# Altium PCB Knob-v1.0.PcbDoc (part 3 of 3)
Units mil, origin at the board's own origin, x right, y up, seen from the top; angles counter-clockwise.
Board outline 3346.46 x 5475.65 mil, 2 copper layers (Top Layer, Bottom Layer), stack 61.811 mil thick; 109 components, 69 nets, 369 pads, 208 vias.
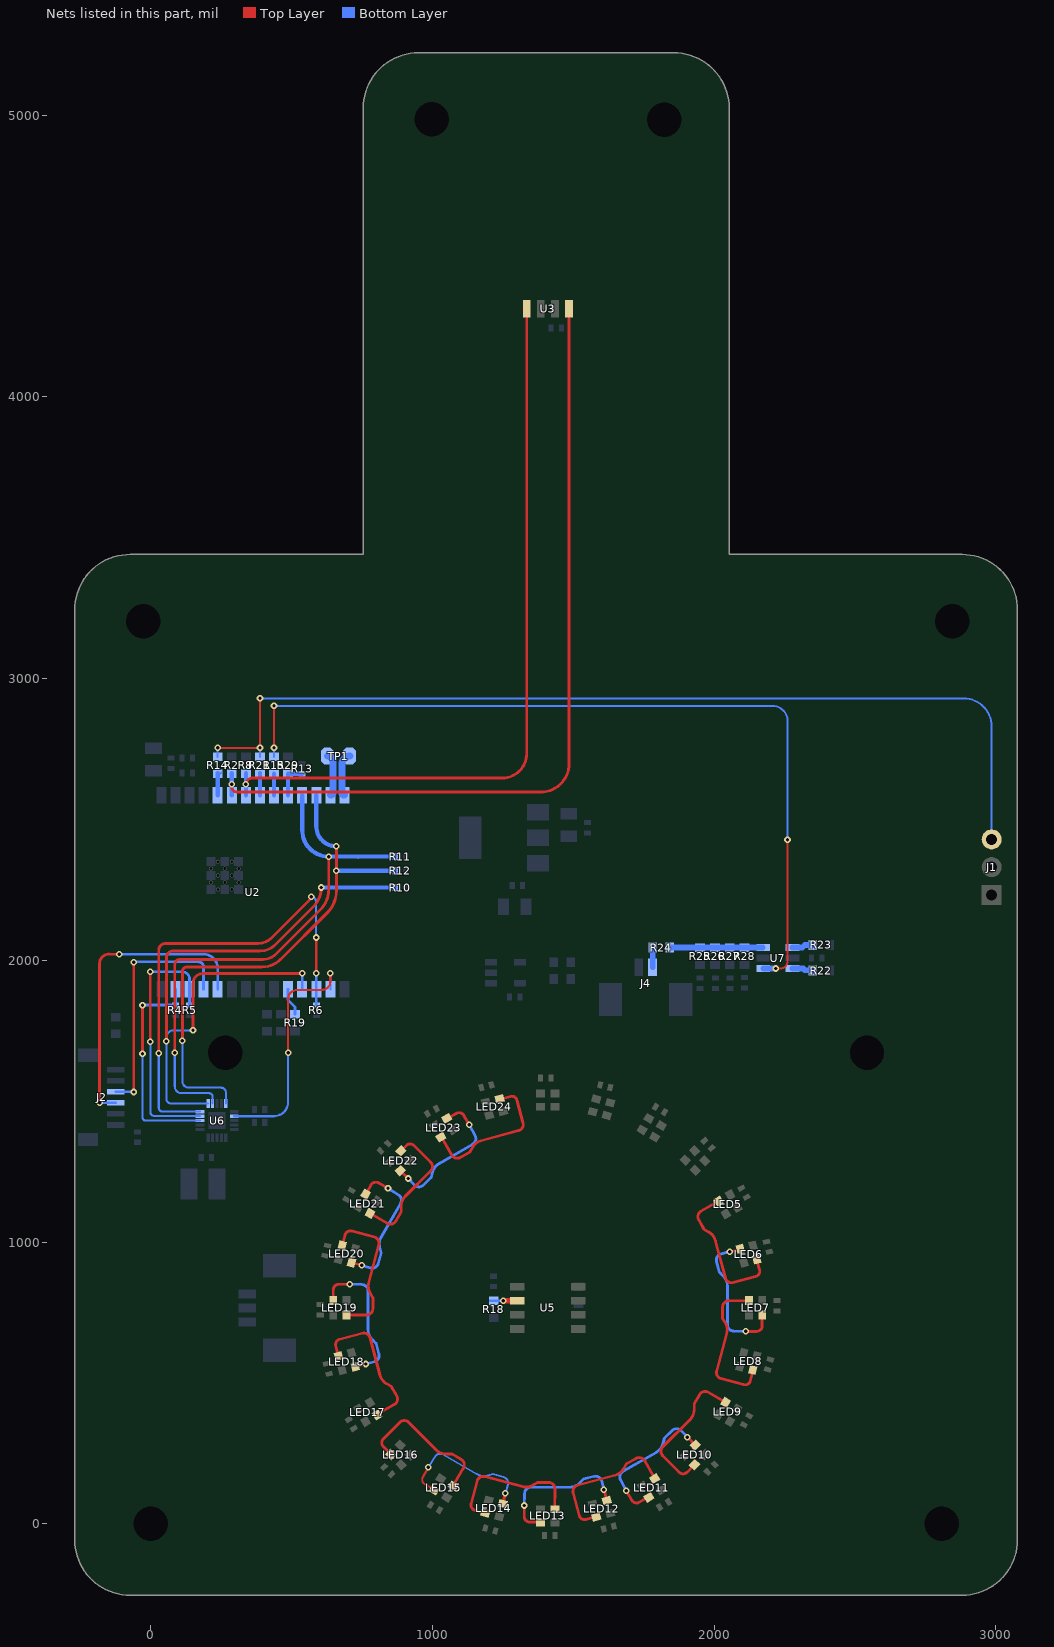
[diagram p2: the nets of this part, all layers, seen from the top]

## Via types
v1: diameter 23.62, hole 11.81, Top Layer to Bottom Layer, tented both sides, 208 vias

## Nets (pads, with @x,y where several pads share a name; then routed paths per layer and width w, separated by ;. In a path a pad name is that pad's centre, name@x,y a point inside that pad or via, vN(x,y) a via of type N, cw(c..) or ccw(c..) an arc to the next point about the centre after c; other vN are vias at no path point) (continued)
NetLED5_2: LED5.2 LED6.4 | length 527.3
  Top Layer w10: 1953.54,1109.03 LED5.2@2015.18,1143.91 ; 1953.54,1109.04 ccw(c1964.93,1089.8) 1945.56,1078.65 1964.48,1045.17 1981.35,1035.43 cw(c1957.71,992.71) 2004.87,1005.35 2040.59,872.04 ccw(c2062.15,877.78) 2067.68,856.17 2147.64,877.6 2147.7,877.62 ccw(c2142.6,897.08) 2160.04,887.05 ccw(c2144.06,896.23) 2161.86,901 LED6.4@2151.92,938.09
NetLED6_2: LED6.2 LED7.4 | length 526.1
  Top Layer w10: v1(2056.11,965.63) LED6.2@2093.2,975.56 ; v1(2112.73,682.73) 2151.12,682.73 ccw(c2151.23,702.85) 2165.48,688.64 ccw(c2152.42,701.65) 2170.85,701.65 LED7.4@2170.85,740.05
  Bottom Layer w10: 2024.64,957.83 v1@2056.03,965.95 ; 2024.64,957.84 ccw(c2030.66,936.31) 2009.06,930.55 2018.67,893.31 2032.45,879.54 cw(c1998.56,844.39) 2047.38,844.39 2047.38,706.38 ccw(c2069.69,706.35) 2069.44,684.04 v1(2112.73,682.73)
NetLED7_2: LED7.2 LED8.4 | length 528
  Top Layer w10: LED7.2@2123.57,791.5 2113.55,791.59 2053.39,792.11 ccw(c2053.36,785.11) 2053.31,792.11 2053.25,792.11 ccw(c2053.6,768.91) 2030.4,768.94 2030.05,730.48 2039.79,713.61 cw(c1997.96,688.44) 2045.11,675.8 2009.39,542.5 ccw(c2030.94,536.69) 2024.92,515.21 2104.89,493.78 2104.94,493.77 ccw(c2110.25,513.18) 2120.34,495.77 ccw(c2111.1,511.71) 2128.9,506.94 LED8.4@2138.84,544.03
NetLED9_2: LED9.2 LED10.4 | length 527.3
  Top Layer w10: LED10.4@1930.74,209.52 1903.59,182.37 cw(c1890.56,195.4) 1890.59,176.97 cw(c1890.56,197.09) 1876.26,182.94 1876.22,182.98 1817.68,241.52 cw(c1833.63,257.12) 1817.87,272.91 1915.46,370.5 ccw(c1880.94,405.02) 1929.75,405.91 1929.75,425.39 1949.29,458.52 cw(c1968.63,447.32) 1979.59,466.8 LED9.2@2040.61,430.85
NetLED10_2: LED10.2 LED11.4 | length 526.1
  Top Layer w10: v1(1688.91,116.94) 1708.1,83.69 ccw(c1725.58,93.65) 1720.41,74.21 ccw(c1725.14,92.02) 1734.36,76.06 LED11.4@1767.61,95.26 ; v1(1905.6,307.41) LED10.2@1932.75,280.26
  Bottom Layer w10: 1668.41,155.08 cw(c1687.85,166.02) 1676.72,185.36 1796.24,254.36 ccw(c1771.83,296.64) 1819.21,284.86 1824.25,303.68 1851.7,330.62 cw(c1867.49,314.8) 1883.11,330.78 v1@1905.84,307.65 ; 1668.41,155.08 v1(1688.91,116.94)
NetLED11_2: LED11.2 LED12.4 | length 528
  Top Layer w10: LED12.4@1581.85,24.98 1544.76,15.04 cw(c1539.99,32.84) 1530.8,16.86 cw(c1540.83,34.3) 1521.37,29.2 1521.36,29.25 1499.93,109.22 cw(c1521.54,114.75) 1515.8,136.31 1649.1,172.03 ccw(c1636.47,219.19) 1679.18,195.55 1688.92,212.42 1722.41,231.34 cw(c1733.98,211.23) 1753.9,223.14 1753.93,223.08 cw(c1747.89,219.55) 1753.97,223.02 1783.6,170.65 LED11.2@1788.53,161.94
NetLED12_2: LED12.2 LED13.4 | length 526.1
  Top Layer w10: v1(1326.22,64.33) 1326.22,25.94 ccw(c1346.34,25.83) 1332.14,11.58 ccw(c1345.14,24.64) 1345.14,6.21 LED13.4@1383.54,6.21 ; v1(1609.12,120.95) LED12.2@1619.06,83.86
  Bottom Layer w10: v1(1326.22,64.33) 1327.54,107.62 cw(c1349.84,107.37) 1349.88,129.68 1487.88,129.68 ccw(c1487.88,178.5) 1523.03,144.61 1536.8,158.39 1574.05,168 cw(c1579.8,146.4) 1601.33,152.42 v1@1609.44,121.03
NetLED13_2: LED13.2 LED14.4 | length 527.3
  Top Layer w10: LED14.4@1188.1,37.94 1151.02,47.88 cw(c1155.78,65.68) 1139.84,56.43 cw(c1157.25,66.52) 1137.84,71.83 1137.86,71.89 1159.29,151.85 cw(c1180.77,145.84) 1186.57,167.38 1319.88,131.66 ccw(c1332.51,178.82) 1357.69,136.99 1374.56,146.73 1413.02,146.37 cw(c1412.99,124.02) 1435.34,124.27 LED13.2@1434.72,53.45
NetLED14_2: LED14.2 LED15.4 | length 526.1
  Top Layer w7: v1(986.11,200.14) 966.91,166.89 ccw(c984.28,156.74) 964.86,151.5 ccw(c982.64,156.3) 973.43,140.34 LED15.4@1006.69,121.15
  Top Layer w10: LED14.2@1249.47,70.63 v1(1259.41,107.72)
  Bottom Layer w7: v1(986.11,200.14) 1008.89,236.97 cw(c1028.09,225.6) 1039.27,244.9 1158.79,175.9 ccw(c1183.2,218.18) 1196.69,171.26 1215.51,176.3 1252.56,166 cw(c1246.75,144.42) 1268.4,138.88 v1@1259.73,107.63
NetLED15_2: LED15.2 LED16.4 | length 528
  Top Layer w10: LED16.4@852.94,246.88 825.79,274.03 cw(c838.81,287.06) 820.39,287.03 cw(c840.51,287.06) 826.36,301.36 826.4,301.4 884.94,359.94 cw(c900.53,343.99) 916.33,359.75 1013.92,262.16 ccw(c1048.44,296.68) 1049.32,247.87 1068.81,247.87 1101.94,228.33 cw(c1090.31,208.25) 1110.58,196.96 1110.55,196.9 cw(c1104.46,200.37) 1110.51,196.84 1079.97,145 LED15.2@1074.89,136.37
NetLED17_2: LED17.2 LED18.4 | length 527.3
  Top Layer w10: LED18.4@667.29,594.35 657.36,631.44 cw(c675.15,636.21) 659.18,645.39 cw(c676.62,635.36) 671.51,654.82 671.57,654.84 751.53,676.27 cw(c757.07,654.66) 778.63,660.4 814.34,527.09 ccw(c861.5,539.73) 837.86,497.01 854.74,487.27 873.66,453.79 cw(c854.28,442.64) 865.68,423.4 LED17.2@804.04,388.53
NetLED18_2: LED18.2 LED19.4 | length 526.1
  Top Layer w10: LED19.4@648.53,792.66 648.53,831.05 cw(c666.95,831.06) 653.9,844.06 cw(c668.15,829.86) 668.25,849.98 v1(706.65,849.98) ; LED18.2@726.17,557.14 v1(763.26,567.08)
  Bottom Layer w10: v1(706.65,849.98) 749.93,848.66 cw(c749.68,826.35) 771.99,826.32 771.99,688.31 ccw(c820.82,688.31) 786.92,653.17 800.7,639.39 810.31,602.15 cw(c788.71,596.39) 794.74,574.87 v1@763.35,566.76
NetLED19_2: LED19.2 LED20.4 | length 528
  Top Layer w10: LED20.4@680.54,988.68 690.48,1025.76 cw(c708.28,1021) 699.03,1036.94 cw(c709.12,1019.53) 714.43,1038.94 714.49,1038.92 794.45,1017.49 cw(c788.44,996.02) 809.98,990.21 774.26,856.9 ccw(c821.42,844.27) 779.59,819.1 789.33,802.22 788.97,763.76 cw(c765.77,763.79) 766.12,740.59 766.06,740.59 cw(c766.02,747.59) 765.99,740.59 705.82,741.12 LED19.2@695.81,741.2
NetLED20_2: LED20.2 LED21.4 | length 526.1
  Top Layer w10: LED20.2@712.93,927.01 v1(750.02,917.07) ; LED21.4@763.44,1169.8 782.64,1203.05 cw(c798.6,1193.84) 793.79,1211.63 cw(c799.03,1192.2) 809.18,1209.58 v1(842.44,1190.38)
  Bottom Layer w10: v1@749.93,916.75 781.17,908.09 ; 781.17,908.08 ccw(c786.71,929.74) 808.3,923.92 818.6,960.98 813.55,979.8 cw(c860.48,993.29) 818.19,1017.7 887.2,1137.22 ccw(c867.89,1148.4) 879.26,1167.6 v1(842.44,1190.38)
NetLED21_2: LED21.2 LED22.4 | length 505.5
  Top Layer w10: LED21.2@778.76,1101.85 839.79,1065.91 ccw(c850.74,1085.39) 870.09,1074.19 889.62,1107.31 889.62,1126.8 cw(c938.44,1127.68) 903.92,1162.21 993.8,1252.08 ccw(c978.06,1267.9) 994.22,1283.28 994.15,1283.35 ; LED22.4@888.64,1323.18 908.09,1342.64 cw(c921.13,1329.62) 921.14,1348.04 cw(c921.12,1327.92) 935.28,1342.21 994.11,1283.38
NetLED22_2: LED22.2 LED23.4 | length 526.1
  Top Layer w10: LED22.2@887.42,1252.45 v1(914.57,1225.3) ; LED23.4@1052.56,1437.46 1085.81,1456.66 cw(c1095.02,1440.7) 1099.76,1458.51 cw(c1094.58,1439.07) 1112.06,1449.03 v1(1131.26,1415.78)
  Bottom Layer w10: v1@914.33,1225.07 937.06,1201.94 ccw(c952.68,1217.92) 968.47,1202.09 995.91,1229.04 1000.96,1247.86 cw(c1048.34,1236.08) 1023.92,1278.36 1143.44,1347.36 ccw(c1132.32,1366.7) 1151.76,1377.64 v1(1131.26,1415.78)
NetLED23_2: LED23.2 LED24.4 | length 528
  Top Layer w10: LED23.2@1033.72,1369.84 1038.65,1361.13 1068.28,1308.76 ccw(c1074.35,1312.23) 1068.31,1308.7 1068.35,1308.64 ccw(c1088.26,1320.55) 1099.83,1300.44 1133.32,1319.36 1143.06,1336.23 cw(c1185.78,1312.59) 1173.14,1359.75 1306.45,1395.47 ccw(c1300.7,1417.03) 1322.32,1422.56 1300.89,1502.53 1300.87,1502.58 ccw(c1281.41,1497.48) 1291.44,1514.92 ccw(c1282.26,1498.94) 1277.49,1516.74 LED24.4@1240.4,1506.8
NetR13_1: R13.1 R29.2 U2.10 | length 126.3
  Bottom Layer w15: U2.10@488.16,2586.2 R29.2@488.16,2662 538.16,2662 R13.1@538.16,2661.48
NetR14_2: R14.2 U2.5 | length 87.5
  Bottom Layer w7: R14.2@246.03,2660.81 R14.2@252.2,2666.98
  Bottom Layer w15: U2.5@238.11,2586.25 R14.2@238.11,2664.99
NetR15_2: R15.2 U2.9 | length 75.8
  Bottom Layer w15: U2.9@438.16,2586.2 R15.2@438.15,2662
NetR18_2: R18.2 U5.2 | length 95.6
  Top Layer w20: v1(1251.42,791.41) U5.2@1301.59,791.41
  Bottom Layer w10: R18.2@1206.01,791.41 v1(1251.42,791.41)
NetR19_1: R19.1 U2.19 | length 99.2
  Bottom Layer w10: U2.19@488.16,1897.22 488.16,1858.54 513.02,1833.68 R19.1@513.02,1808.35
NetR21_2: R21.2 U2.8 | length 78.7
  Bottom Layer w15: U2.8@388.16,2586.2 R21.2@388.16,2664.94
NetR22_1: R22.1 U7.6 | length 74.4
  Bottom Layer w20: U7.6@2278.66,1970.69 2316.84,1970.69 2322.44,1965.09 2348.64,1965.09 R22.1@2350.16,1963.57
NetR23_2: R23.2 U7.4 | length 75.2
  Bottom Layer w20: U7.4@2278.66,2045.5 2313.5,2045.5 2322.44,2054.44 R23.2@2350.16,2054.44
NetR24_2: R24.2 R25.2 R26.2 R27.2 R28.2 U7.3 | length 330.1
  Bottom Layer w20: R24.2@1842.32,2045.4 U7.3@2172.42,2045.4
PWM_CTRL: J1.3 R14.1 R21.1 | length 3445.5
  Top Layer w7: v1(238.11,2754.05) v1(388.14,2754.05) v1(388.14,2930)
  Bottom Layer w7: R14.1@238.11,2722 v1(238.11,2754.05) ; R21.1@388.14,2721.99 v1(388.14,2754.05) ; v1(388.14,2930) 2885.67,2930 cw(c2885.67,2830) 2985.67,2830 J1.3@2985.67,2429.21
RXD0: J2.4 U2.24 | length 1094.8
  Top Layer w10: v1(-181.15,1494.28) -181.15,1988.85 cw(c-148,1988.85) -149.29,2021.97 ccw(c-143.31,2048.11) -148.05,2021.72 ccw(c-143.31,2048.11) -138.56,2021.72 v1(-111.72,2021.72) cw(c-111.72,2021) v1@-111,2021
  Bottom Layer w10: v1(-181.15,1494.28) -181.15,1494.09 J2.4@-123.58,1494.09 ; v1(-111.72,2021.72) 188.11,2021.72 cw(c188.11,1971.67) 232.58,1994.63 cw(c188.11,1971.67) 237.79,1977.77 cw(c188.11,1971.67) 238.16,1971.67 U2.24@238.16,1897.22
SCL: R8.1 U2.7 U3.1 | length 2716.5
  Top Layer w10: v1(338.16,2624.57) cw(c360.59,2624.57) 360.59,2647 1248,2647 ccw(c1248,2734.28) 1335.28,2734.28 U3.1@1335.28,4313.31
  Bottom Layer w15: U2.7@338.16,2586.2 v1(338.16,2624.57) R8.1@338.16,2663.94
SDA: R2.1 U2.6 U3.4 | length 2968.3
  Top Layer w10: v1(287.76,2624.57) 287.76,2615.4 ccw(c305.88,2615.4) 292.89,2602.77 ccw(c305.88,2615.4) 305.88,2597.28 1385.28,2597.28 ccw(c1385.28,2697.28) 1408.64,2600.05 ccw(c1385.28,2697.28) 1485.28,2697.28 U3.4@1485.28,4313.31
  Bottom Layer w15: R2.1@287.76,2663.94 v1(287.76,2624.57) 287.76,2586.2 U2.6@288.16,2586.2
TMC_DIAG: U2.16 U6.12 | length 857.1
  Top Layer w8: v1(488.02,1672.07) 488.02,1862.35 cw(c520.44,1862.35) 520.44,1894.77 608.31,1894.77 ccw(c608.31,1924.52) 638.05,1924.52 v1(638.05,1954)
  Bottom Layer w7.5: U2.16@638.21,1897.22 v1@638.21,1954
  Bottom Layer w8: U6.12@296.69,1446.85 437.83,1446.85 ccw(c437.83,1497.04) 488.02,1497.04 v1(488.02,1672.07)
TMC_UH: R4.2 U2.27 U6.3 | length 781.7
  Top Layer w10: v1(-28.91,1668.48) v1(-28.91,1841)
  Bottom Layer w7: U2.27@87.87,1897.22 U2.27@88.16,1897.22
  Bottom Layer w7.5: v1(-28.91,1668.48) -28.91,1442.77 ccw(c-17.24,1442.77) -17.24,1431.1 U6.3@174.65,1431.1
  Bottom Layer w10: v1(-28.91,1841) R4.2@87.87,1841 U2.27@87.87,1897.22
TMC_UL: R10.2 U2.18 U6.6 | length 2348.4
  Top Layer w10: v1(55.83,1712.73) 55.83,2008.9 cw(c80.07,2008.9) 80.07,2033.14 388.46,2033.14 ; v1(150.66,1751.44) 150.66,1918.67 cw(c184.6,1918.67) 184.6,1952.61 536.66,1952.61 ccw(c536.66,1954) v1(538.05,1954) ; 388.5,2033.14 ccw(c388.5,2110.08) 442.93,2055.7 578.24,2191.02 ccw(c512.87,2256.39) 605.32,2256.39 v1(605.32,2258.35)
  Bottom Layer w7.5: v1(150.66,1751.44) 81.46,1751.44 ccw(c81.46,1725.8) 55.83,1725.8 v1(55.83,1712.73) 55.83,1507.87 ccw(c71.58,1507.87) 71.58,1492.13 U6.6@204.17,1492.13 ; U2.18@538.21,1897.22 v1@538.21,1954
  Bottom Layer w15: v1(605.32,2258.35) R10.2@868.38,2258.35
TMC_VH: R5.2 U2.26 U6.4 | length 927.8
  Top Layer w10: v1(-1.07,1711.15) v1(-1.07,1959.17)
  Bottom Layer w7.5: v1(-1.07,1711.15) -1.07,1462.6 ccw(c14.67,1462.6) 14.67,1446.85 U6.4@174.65,1446.85
  Bottom Layer w10: v1(-1.07,1959.17) 112.73,1959.17 cw(c112.73,1933.74) 138.16,1933.74 U2.26@138.16,1897.22 R5.2@138.16,1841
TMC_VL: R12.2 U2.12 U6.10 | length 1882.2
  Top Layer w10: v1@112.73,1712.73 v1(112.73,1714.3) 112.73,1960 cw(c128.97,1960) 128.97,1976.24 395.78,1976.24 395.84,1976.24 ccw(c395.87,2069.19) 461.63,2003.49 627.05,2168.92 ccw(c549.18,2246.81) 659.32,2246.81 ; v1@659,2405 v1(659.32,2405) v1(659.32,2318.16) 659.32,2246.86
  Bottom Layer w7.5: v1(112.73,1714.3) 112.73,1571.23 ccw(c135.97,1571.23) 135.97,1547.99 249.77,1547.99 cw(c249.77,1530.44) 267.32,1530.44 U6.10@267.32,1492.13
  Bottom Layer w15: U2.12@588.16,2586.2 588.16,2476 ccw(c659.16,2476) 659.16,2405 v1(659.32,2405) ; v1(659.32,2318.16) 736.73,2318.16 737.32,2317.56 761.85,2317.9 R12.2@868.39,2317.9
TMC_WH: R6.2 U2.17 U6.5 | length 1729.7
  Top Layer w7.5: v1(588,1954) v1(588,2080.72)
  Top Layer w10: v1@28.97,1671.63 28.97,2036.04 cw(c52.93,2036.04) 52.93,2060 380.72,2060 ; 380.77,2060 ccw(c380.77,2130.68) 430.77,2080.72 567.24,2217.19 ccw(c567.24,2220.43) 570.48,2220.43 v1(570.48,2225.18)
  Bottom Layer w7.5: v1(28.97,1670.06) 28.97,1476.38 ccw(c42.75,1476.38) 42.75,1462.6 U6.5@174.65,1462.6 ; v1(570.48,2225.18) cw(c570.48,2208.66) 587,2208.66 587,2081.72 v1(588,2080.72) ; v1(588,1954) 588.16,1954 U2.17@588.16,1897.22 ; R6.2@588.11,1841 U2.17@588.16,1897.22
TMC_WL: R11.2 U2.11 U6.7 | length 1913.6
  Top Layer w10: v1(85.87,1671.63) 85.87,1985.37 cw(c103.6,1985.37) 103.6,2003.1 398.75,2003.1 398.81,2003.1 ccw(c398.84,2067.84) 444.65,2022.09 603.37,2180.81 ccw(c534,2250.22) 632.13,2250.22 632.13,2250.29 v1(632.13,2368.16)
  Bottom Layer w7.5: v1(85.87,1671.63) 85.87,1552.07 ccw(c109.57,1552.07) 109.57,1528.36 207.74,1528.36 cw(c207.74,1516.18) 219.92,1516.18 U6.7@219.92,1492.13
  Bottom Layer w15: U2.11@538.16,2586.2 538.16,2462.13 ccw(c632.13,2462.13) v1(632.13,2368.16) 736.73,2368.16 737.32,2367.56 761.85,2368.09 R11.2@868.39,2368.09
TOUCH: J4.1 R24.1 | length 70.2
  Bottom Layer w20: J4.1@1781.93,1975.39 1782.32,1975.79 R24.1@1782.32,2045.4
TOUCH_IN: R15.1 U7.1 | length 2998.8
  Top Layer w7: v1(438.15,2755) v1(438.08,2903.16) ; v1@2209.31,1970.69 v1(2219.31,1970.69) 2235.92,1970.69 ccw(c2235.92,1995.89) 2261.12,1995.89 2261.12,2428 v1(2261,2428)
  Bottom Layer w7: v1(438.15,2755) v1(438.15,2755) R15.1@438.15,2722 ; v1(438.08,2903.16) 2207.97,2903.16 cw(c2207.97,2850.13) 2261,2850.13 v1(2261,2428)
  Bottom Layer w20: U7.1@2175.51,1970.69 v1(2219.31,1970.69)
TXD0: J2.3 U2.25 | length 856.8
  Top Layer w10: v1(-60,1532.37) v1(-60,1993)
  Bottom Layer w10: J2.3@-123.58,1533.46 -67.86,1533.46 cw(c-67.86,1532.37) v1@-66.77,1532.37 ; v1(-60,1993) cw(c-58.37,1993) -58.37,1994.63 170,1994.63 cw(c170,1976.47) 188.16,1976.47 U2.25@188.16,1897.22
USB_D_N: TP1.2 U2.13 | length 154.7
  Bottom Layer w25: TP1.2@628.26,2725 cw(c628.26,2706.1) 647.16,2706.1 647.16,2595.2 cw(c638.16,2595.2) U2.13@638.16,2586.2
USB_D_P: TP1.1 U2.14 | length 159.8
  Bottom Layer w25: U2.14@688.16,2586.2 cw(c688.16,2595.2) 679.16,2595.2 679.16,2697.16 cw(c707,2697.16) TP1.1@707,2725
pads on no net: J4.2 LED24.2 U2.4 U2.22 U2.23 U4.1 U5.3 U5.5 U6.19

## Polygon pours and split planes (outlines as drawn)
GND on Top Layer "NONET_L-01_P-001" (solid, remove dead copper, pour order 40): -269.25,-57.09 -269.25,3244.09 cw(c-72.4,3244.09) -72.4,3440.94 755.22,3440.94 754.64,5024.78 cw(c951.49,5024.86) 951.49,5221.71 1857,5221.71 cw(c1857,5024.86) 2053.85,5024.87 2053.97,3440.94 2880.35,3440.94 cw(c2880.35,3244.09) 3077.2,3244.09 3077.2,-57.09 cw(c2880.35,-57.09) 2880.35,-253.94 -72.4,-253.94 cw(c-72.4,-57.09)
5V on Top Layer "NONET_L-01_P-001" (solid, pour order 31): 181.32,1135.16 cw(c214.32,1135.16) 214.32,1168.16 382.61,1168.16 583.89,1168.16 524.17,749.78 607.32,347.16 942.32,1.16 1377.48,-118.82 1790.32,-43.84 2098.72,209.52 2285.91,543.35 2295.7,941.65 2204.53,1161.08 2593.32,1161.08 ccw(c2593.32,1261.08) 2693.32,1261.08 2693.32,2216.16 cw(c2756.32,2216.16) 2756.32,2279.16 3007.77,2279.16 cw(c3007.77,2232.36) 3054.57,2232.36 3054.57,-44.51 cw(c2870.24,-44.51) 2870.24,-228.84 1319,-228.84 cw(c1307.78,700.62) 378.32,689.43 378.32,920.16 ccw(c341.79,920.16) 341.79,956.69 216.26,956.69 cw(c216.26,991.63) 181.32,991.63
3V3 on Bottom Layer "3V3_L02_P042" (solid, pour order 42): 480.53,1697.82 469.18,1697.82 ccw(c469.18,1682.42) 453.78,1682.42 453.78,1540.79 cw(c441.35,1540.79) 441.35,1528.36 396.2,1528.36 ccw(c396.2,1509.37) 377.2,1509.36 377.2,1456.69 296.69,1456.69 296.69,1777.23 -141.08,1777.23 -141.08,1813 343.66,1813 cw(c343.76,1784.5) 345.06,1812.97 359.01,1813 cw(c359.01,1795) 377.01,1795 ccw(c393.7,1795) 393.7,1778.31 396.11,1778.31 442.03,1778.31 465.53,1778.31 cw(c465.53,1763.31) 480.53,1763.31
GND on Bottom Layer "NONET_L-01_P-001" (solid, remove dead copper, pour order 41): -269.25,-57.09 -269.25,3244.09 cw(c-72.4,3244.09) -72.4,3440.94 755.22,3440.94 754.64,5024.78 cw(c951.49,5024.86) 951.49,5221.71 1857,5221.71 cw(c1857,5024.86) 2053.85,5024.87 2053.97,3440.94 2880.35,3440.94 cw(c2880.35,3244.09) 3077.2,3244.09 3077.2,-57.09 cw(c2880.35,-57.09) 2880.35,-253.94 -72.4,-253.94 cw(c-72.4,-57.09)

## Other copper
Top Layer:
  region net 3V3: 955.67,1864 2263.43,1864 ccw(c2263.43,1942.57) 2342,1942.57 2342,2026.91 ccw(c2323.43,2034.41) 2323.43,2054.44 2290.38,2054.44 ccw(c2290.38,2045.5) 2281.43,2045.5 2281.43,1958.49 cw(c2256.95,1958.49) 2256.95,1934 938,1934 ccw(c938,1919) 923,1919 923,1877.25 ccw(c934.32,1875.32) 936.25,1864
  pour cut-out: 1414.06,4266.81 1414.06,4281.81 1456.5,4281.81 1456.5,4266.81
Bottom Layer:
  rectangle net 3V3: 296.69,1457.9 377.2,1484.14
  rectangle net NetJ2_1: -155.08,1602.36 -92.09,1753.48
  rectangle net GND: 232.15,1446.44 255.12,1507.87
  region net 3V3: 1491.12,2405.74 1709.91,2405.74 ccw(c1709.91,2446.15) 1750.32,2446.16 1750.32,2832.16 ccw(c1707.29,2832.16) 1707.29,2875.19 -86.64,2875.19 ccw(c-86.65,2839.16) -122.68,2839.16 -122.68,2667.16 ccw(c-88.68,2667.15) -88.68,2633.16 54.01,2633.16 cw(c54.02,2616.78) 70.39,2616.77 70.39,2557.72 105.83,2557.72 105.83,2618.14 cw(c120.84,2618.15) 120.84,2633.16 120.84,2690.98 120.84,2694.48 -15.17,2694.48 cw(c-15.18,2714.23) -34.93,2714.24 -34.93,2764.17 -34.93,2810.36 cw(c-16.95,2810.37) -16.94,2828.35 50.87,2828.35 270.61,2828.35 270.61,2714.24 355.73,2714.24 355.73,2828.35 520.44,2828.35 520.44,2689.48 555.88,2689.48 555.88,2828.35 1016.13,2828.35 cw(c1016.14,2784.17) 1060.32,2784.16 1060.32,2560.16 1060.32,2482.16 cw(c1026.33,2482.15) 1026.32,2448.16 913.01,2448.16 ccw(c913.01,2425.58) 890.43,2425.58 890.43,1796 1081.32,1796 1081.32,2288.16 cw(c1099.32,2288.16) 1099.32,2306.16 1263.78,2306.16 ccw(c1263.79,2328.24) 1285.87,2328.24 1285.87,2383.29 cw(c1308.32,2383.29) 1308.32,2405.74 hole: 1578.71,2641.45 1328.86,2641.45 1323.01,2640.29 1316.6,2637.64 1311.64,2634.32 1306.74,2629.42 1303.43,2624.46 1300.78,2618.06 1299.61,2612.2 1299.61,2492.99 1300.78,2487.13 1303.31,2481.02 1306.62,2476.06 1311.3,2471.38 1316.27,2468.06 1322.38,2465.53 1328.23,2464.36 1573.5,2464.36 1574.98,2464.66 1577.82,2464.66 1577.82,2465.22 1579.36,2465.53 1586.15,2468.34 1591.12,2471.66 1596.32,2476.86 1599.64,2481.83 1602.45,2488.62 1603.62,2494.48 1603.62,2616.54 1602.45,2622.4 1600.63,2626.81 1597.31,2631.77 1593.93,2635.15 1588.97,2638.46 1584.56,2640.29
  region net BLDC_U: 602.25,1060.23 cw(c602.25,1035.36) 627.12,1035.36 627.12,750.63 cw(c608.77,750.63) 608.77,732.28 311.46,732.28 311.46,700.79 659.39,700.79 ccw(c659.11,722.54) 680.86,722.82 680.86,1109.94 ccw(c650.8,1109.94) 650.74,1140 477.1,1140 cw(c477.1,1164.78) 452.32,1164.82 452.32,1389.24 ccw(c436.06,1389.25) 436.05,1405.51 280.95,1405.51 280.95,1385.83 359.2,1385.83 cw(c359.2,1372.71) 372.32,1372.71 372.32,1216.13 372.32,1088.53 ccw(c400.62,1088.53) 400.62,1060.23
  region net GND: 350.27,1375.63 cw(c350.27,1367.4) 358.5,1367.4 358.5,1331.06 cw(c350.33,1331.06) 350.33,1322.89 268.52,1322.89 cw(c268.52,1329.15) 262.26,1329.15 262.26,1370.08 cw(c267.81,1370.08) 267.81,1375.63
  region net BLDC_V: 588.64,1043.84 cw(c588.64,1018.64) 613.83,1018.64 613.83,771.99 cw(c591.84,771.99) 591.84,750 311.46,750 311.46,781.5 546.88,781.5 ccw(c546.88,802.65) 568.03,802.65 568.03,959.04 ccw(c547.07,959.04) 547.07,980 325,980 cw(c325,1012.71) 292.28,1012.72 292.28,1278.43 ccw(c283.02,1278.43) 283.02,1287.7 253.64,1287.7 cw(c253.64,1295.82) 245.51,1295.83 245.51,1385.83 257.32,1385.83 257.32,1321.78 ccw(c266.41,1321.78) 266.41,1312.7 338.05,1312.7 cw(c338.05,1301.3) 349.45,1301.3 349.45,1180.76 349.45,1067.41 ccw(c373.01,1067.41) 373.01,1043.84
  pour cut-out: 1314.91,2509.66 1314.91,2596.16 cw(c1344.91,2596.16) 1344.91,2626.16 1558.32,2626.16 cw(c1558.32,2596.16) 1588.32,2596.16 1588.32,2509.66 cw(c1558.32,2509.66) 1558.32,2479.66 1344.91,2479.66 cw(c1344.91,2509.66)
  region net GND: 296.69,1420.33 255.52,1420.33 ccw(c252.06,1414.34) 246.48,1410.25 296.69,1410.25
  region net GND: 120.84,2705.98 -6.37,2705.98 cw(c-6.37,2719.54) -19.93,2719.54 -19.93,2807.35 cw(c-9.12,2807.35) -9.12,2818.16 118.68,2818.16 cw(c118.68,2806.49) 130.34,2806.49 130.34,2715.48 cw(c120.84,2715.48)
  region net 5V: 241.08,1291.22 241.08,1285.21 ccw(c248.04,1285.21) 248.04,1278.25 264.08,1278.25 cw(c264.09,1268.98) 273.35,1268.98 273.35,1068.38 cw(c264.53,1068.37) 264.53,1059.56 209.85,1059.56 cw(c209.84,1070.13) 199.27,1070.13 199.27,1323.33 cw(c206.17,1323.33) 206.17,1330.23 223.75,1330.23 ccw(c223.75,1336.24) 229.76,1336.24 229.76,1385.83 241.08,1385.83
  region net BLDC_W: 61.02,874.02 61.02,840.27 ccw(c70.58,840.27) 70.58,830.71 374.45,830.71 374.45,799.21 1.27,799.21 cw(c1.27,819.46) -18.98,819.46 -18.98,898.61 -18.98,1067.06 -18.98,1387.85 cw(c-1.32,1387.85) -1.32,1405.51 190.39,1405.51 190.39,1385.83 74.14,1385.83 ccw(c74.14,1372.71) 61.02,1372.71
  region net 5V: 2931,2125.16 3026.52,2125.16 3026.52,2277.8 2012.32,2277.8 2009.38,2277.94 2003.61,2279.09 1998.18,2281.34 1993.29,2284.6 1989.13,2288.76 1985.86,2293.65 1983.61,2299.09 1982.47,2304.85 1982.32,2307.8 1982.32,2350.16 1982.32,2353.52 1981.01,2360.1 1978.44,2366.31 1974.71,2371.89 1969.96,2376.64 1964.38,2380.37 1958.18,2382.94 1954.71,2383.63 1948.23,2384.25 1346.1,2384.25 1342.77,2384.25 1336.25,2382.95 1330.1,2380.4 1324.57,2376.71 1319.86,2372 1316.17,2366.47 1313.62,2360.32 1313,2357.19 1312.32,2350.47 1312.32,2153.6 1313.54,2147.51 1315.91,2141.76 1321.13,2133.96 1328.93,2128.75 1334.67,2126.37 1340.77,2125.16 1343.88,2125.16
  region net GND: 178.96,1375.12 77.87,1375.12 77.87,1335.65 210.08,1335.65 210.08,1375.12
  region net GND: 272.21,1395.29 272.21,1417.43 262.12,1417.43 262.12,1404.33 262.12,1370.08 272.21,1370.08
  region net GND: 1583.12,2624.33 1586.5,2620.95 1588.32,2616.54 1588.32,2614.16 1588.32,2498.16 1588.32,2494.48 1585.51,2487.68 1580.3,2482.47 1573.5,2479.66 1328.23,2479.66 1322.12,2482.19 1317.44,2486.87 1314.91,2492.99 1314.91,2496.3 1314.91,2608.74 1314.91,2612.2 1317.56,2618.61 1322.46,2623.51 1328.86,2626.16 1578.71,2626.16
Multi-Layer:
  pour cut-out: 2650.48,0 ccw(c2807.96,0) 2807.96,-157.48 ccw(c2807.96,0) 2965.44,0 ccw(c2807.96,0) 2807.96,157.48 ccw(c2807.96,0)
  pour cut-out: 143.41,1672.07 ccw(c264.83,1672.07) 264.83,1550.65 ccw(c264.83,1672.07) 386.25,1672.07 ccw(c264.83,1672.07) 264.83,1793.49 ccw(c264.83,1672.07)
  pour cut-out: 2421.7,1672.07 ccw(c2543.12,1672.07) 2543.12,1550.65 ccw(c2543.12,1672.07) 2664.55,1672.07 ccw(c2543.12,1672.07) 2543.12,1793.49 ccw(c2543.12,1672.07)
  pour cut-out: 840.45,4985.39 ccw(c997.93,4985.39) 997.93,4827.91 ccw(c997.93,4985.39) 1155.41,4985.39 ccw(c997.93,4985.39) 997.93,5142.87 ccw(c997.93,4985.39)
  pour cut-out: 1666.24,4984.4 ccw(c1823.72,4984.4) 1823.72,4826.92 ccw(c1823.72,4984.4) 1981.2,4984.4 ccw(c1823.72,4984.4) 1823.72,5141.88 ccw(c1823.72,4984.4)
  pour cut-out: -157.48,0 ccw(c0,0) 0,-157.48 ccw(c0,0) 157.48,0 ccw(c0,0) 0,157.48 ccw(c0,0)
  pour cut-out: -183.17,3203.89 ccw(c-25.69,3203.89) -25.69,3046.41 ccw(c-25.69,3203.89) 131.79,3203.89 ccw(c-25.69,3203.89) -25.69,3361.37 ccw(c-25.69,3203.89)
  pour cut-out: 2688.88,3203.89 ccw(c2846.36,3203.89) 2846.36,3046.41 ccw(c2846.36,3203.89) 3003.84,3203.89 ccw(c2846.36,3203.89) 2846.36,3361.37 ccw(c2846.36,3203.89)

## Silkscreen, mask and mechanical layers (free items; w line width, h text height)
Top Overlay:
  circle w10: c1409.86,766.41 r590.55
  lines w10: -179.7,80.39 487.84,1600.48 ; -0.01,-196.85 2820.71,-196.85 ; 650.1,1706.41 2169.18,1706.42 ; 1270.39,566.8 cw(c1409.97,769.55) 1548.77,566.27 ; 2331.34,1600.62 3000.88,79.29
  text "LIGHT SENSOR" at 1125.24,4450.43 h100
  text "ENCODER" at 1213.5,491.94 h100
Bottom Overlay:
  lines w5: 1.83,2633.16 -42.91,2633.16 -42.91,2863.16 151.49,2863.16
  text "Rev-v1.0" at 751.33,3333.62 h60
  text "D_N" at 625.97,2773.29 h60 r270
  text "D_P" at 666.88,2763.35 h60 r270
  text "PWM" at 2823.98,2399.58 h100
  text "GND" at 2833.98,2291.16 h100
  text "5V0" at 2833.98,2192.66 h100
  text "VOLTLINK" at -224.07,1745.76 h100 r270
  text "TOUCH" at 1895.74,1695.84 h100
  text "BLDC" at 569.63,665.43 h100 r270
Dimension:
  circle w10: c1409.84,766.42 r885.83
  circle w10: c1409.86,766.41 r738.19
  lines w10: 434.27,505.01 2335.7,1014.5 ; 453.19,212.6 2374.24,1323.2 ; 461.06,766.41 2429.57,766.41 ; 592.27,1238.45 2297.04,254.2 ; 655.66,12.1 2075.44,1431.88 ; 706.45,1469.91 2179.62,-3.22 ; 858.95,1720.61 1971.15,-205.78 ; 879.26,-152.61 1883.2,1586.26 ; 1140.92,1769.85 1680.15,-242.51 ; 1148.15,-210.53 1667.83,1728.93 ; 1409.88,-253.94 1409.86,1829.41
  lines w15: 484.36,1014.25 2408.18,498.77
Board Outline:
  circle w5: c1208.61,419.72 r35.43
  circle w5: c1814,769.21 r35.43
  circle w5: c1208.61,1118.74 r35.43
  circle w5: c1688.27,1048.07 r59.06
  lines w5: -269.25,-57.09 ccw(c-72.4,-57.09) -72.4,-253.94 ; -269.25,-57.09 ccw(c-72.4,-57.09) -72.4,-253.94 ; -269.25,-57.09 ccw(c-72.4,-57.09) -72.4,-253.94 ; -269.25,-57.09 ccw(c-72.4,-57.09) -72.4,-253.94 ; -269.25,-57.09 -269.25,3244.09 ; -269.25,-57.09 -269.25,3244.09 ; -269.25,-57.09 -269.25,3244.09 ; -269.25,-57.09 -269.25,3244.09 ; -269.25,3244.09 cw(c-72.4,3244.09) -72.4,3440.94 ; -269.25,3244.09 cw(c-72.4,3244.09) -72.4,3440.94 ; -269.25,3244.09 cw(c-72.4,3244.09) -72.4,3440.94 ; -269.25,3244.09 cw(c-72.4,3244.09) -72.4,3440.94 ; -72.4,-253.94 2880.35,-253.94 ; -72.4,-253.94 2880.35,-253.94 ; -72.4,-253.94 2880.35,-253.94 ; -72.4,-253.94 2880.35,-253.94 ; -72.4,3440.94 755.22,3440.94 ; -72.4,3440.94 755.22,3440.94 ; -72.4,3440.94 755.22,3440.94 ; -72.4,3440.94 755.22,3440.94 ; 754.64,5024.78 cw(c951.49,5024.86) 951.49,5221.71 ; 754.64,5024.78 cw(c951.49,5024.86) 951.49,5221.71 ; 754.64,5024.78 cw(c951.49,5024.86) 951.49,5221.71 ; 754.64,5024.78 cw(c951.49,5024.86) 951.49,5221.71 ; 754.64,5024.78 755.22,3440.94 ; 754.64,5024.78 755.22,3440.94 ; 754.64,5024.78 755.22,3440.94 ; 754.64,5024.78 755.22,3440.94 ; 922.9,612.2 cw(c1409.88,769.68) 922.9,927.16 ; 922.9,612.2 cw(c1409.88,769.68) 922.9,927.16 ; 922.9,612.2 cw(c1409.88,769.68) 922.9,927.16 ; 922.9,612.2 cw(c1409.88,769.68) 922.9,927.16 ; 922.9,612.2 1055.55,612.2 ; 922.9,612.2 1055.55,612.2 ; 922.9,612.2 1055.55,612.2 ; 922.9,612.2 1055.55,612.2 ; 922.9,927.16 1055.55,927.16 ; 922.9,927.16 1055.55,927.16 ; 922.9,927.16 1055.55,927.16 ; 922.9,927.16 1055.55,927.16 ; 923.44,611.75 cw(c1410.43,769.23) 923.44,926.71 ; 923.44,611.75 cw(c1410.43,769.23) 923.44,926.71 ; 923.44,611.75 cw(c1410.43,769.23) 923.44,926.71 ; 923.44,611.75 cw(c1410.43,769.23) 923.44,926.71 ; 923.44,611.75 1056.09,611.75 ; 923.44,611.75 1056.09,611.75 ; 923.44,611.75 1056.09,611.75 ; 923.44,611.75 1056.09,611.75 ; 923.44,926.71 1056.09,926.71 ; 923.44,926.71 1056.09,926.71 ; 923.44,926.71 1056.09,926.71 ; 923.44,926.71 1056.09,926.71 ; 951.49,5221.71 1857,5221.71 ; 951.49,5221.71 1857,5221.71 ; 951.49,5221.71 1857,5221.71 ; 951.49,5221.71 1857,5221.71 ; 1055.55,612.2 1055.55,927.16 ; 1055.55,612.2 1055.55,927.16 ; 1055.55,612.2 1055.55,927.16 ; 1055.55,612.2 1055.55,927.16 ; 1056.09,611.75 1056.09,926.71 ; 1056.09,611.75 1056.09,926.71 ; 1056.09,611.75 1056.09,926.71 ; 1056.09,611.75 1056.09,926.71 ; 1857,5221.71 cw(c1857,5024.86) 2053.85,5024.87 ; 1857,5221.71 cw(c1857,5024.86) 2053.85,5024.87 ; 1857,5221.71 cw(c1857,5024.86) 2053.85,5024.87 ; 1857,5221.71 cw(c1857,5024.86) 2053.85,5024.87 ; 2053.85,5024.87 2053.97,3440.94 ; 2053.85,5024.87 2053.97,3440.94 ; 2053.85,5024.87 2053.97,3440.94 ; 2053.85,5024.87 2053.97,3440.94 ; 2053.97,3440.94 2880.35,3440.94 ; 2053.97,3440.94 2880.35,3440.94 ; 2053.97,3440.94 2880.35,3440.94 ; 2053.97,3440.94 2880.35,3440.94 ; 2880.35,-253.94 ccw(c2880.35,-57.09) 3077.2,-57.09 ; 2880.35,-253.94 ccw(c2880.35,-57.09) 3077.2,-57.09 ; 2880.35,-253.94 ccw(c2880.35,-57.09) 3077.2,-57.09 ; 2880.35,-253.94 ccw(c2880.35,-57.09) 3077.2,-57.09 ; 2880.35,3440.94 cw(c2880.35,3244.09) 3077.2,3244.09 ; 2880.35,3440.94 cw(c2880.35,3244.09) 3077.2,3244.09 ; 2880.35,3440.94 cw(c2880.35,3244.09) 3077.2,3244.09 ; 2880.35,3440.94 cw(c2880.35,3244.09) 3077.2,3244.09 ; 3077.2,-57.09 3077.2,3244.09 ; 3077.2,-57.09 3077.2,3244.09 ; 3077.2,-57.09 3077.2,3244.09 ; 3077.2,-57.09 3077.2,3244.09
Fabrication:
  drawing of 12506 lines, arcs and shapes, not listed
  text "Layer" at 4080.74,5150 h60
  text "Name" at 4490.65,5150 h60
  text "Material" at 5420.4,5150 h60
  text "Thickness" at 6280.16,5150 h60
  text "Constant" at 6930,5150 h60
  text "Board Layer Stack" at 7499.86,5150 h60
  text "Top Overlay" at 4490.65,5030 h60
  text "Top Solder" at 4490.65,4910 h60
  text "Solder Resist" at 5420.4,4910 h60
  text "0.010mm" at 6280.16,4910 h60
  text "3.5" at 6930,4910 h60
  text "1" at 4080.74,4790 h60
  text "Top Layer" at 4490.65,4790 h60
  text "0.035mm" at 6280.16,4790 h60
  text "Dielectric 1" at 4490.65,4670 h60
  text "FR-4" at 5420.4,4670 h60
  text "1.500mm" at 6280.16,4670 h60
  text "4.8" at 6930,4670 h60
  text "2" at 4080.74,4550 h60
  text "Bottom Layer" at 4490.65,4550 h60
  text "0.035mm" at 6280.16,4550 h60
  text "Bottom Solder" at 4490.65,4430 h60
  text "Solder Resist" at 5420.4,4430 h60
  text "0.010mm" at 6280.16,4430 h60
  text "3.5" at 6930,4430 h60
  text "Bottom Overlay" at 4490.65,4310 h60
  text "Total board thickness:" at 4080.74,4190 h60
  text "1.590mm" at 6280.16,4190 h60
Mechanical 4:
  circle w0.5: c1822.99,4985.49 r59.06
  circle w0.5: c1208.09,1119.19 r31.5
  circle w0.5: c1813.46,769.68 r31.5
  circle w0.5: c1208.09,420.18 r31.5
  circle w0.5: c-27.13,3204.72 r59.06
  circle w0.5: c996.78,4985.49 r59.06
  circle w0.5: c2846.89,3204.72 r59.06
  circle w0.5: c1822.99,4985.49 r59.06
  circle w0.5: c1208.09,1119.19 r31.5
  circle w0.5: c1813.46,769.68 r31.5
  circle w0.5: c1208.09,420.18 r31.5
  circle w0.5: c-27.13,3204.72 r59.06
  circle w0.5: c996.78,4985.49 r59.06
  circle w0.5: c2846.89,3204.72 r59.06
  circle w0.5: c2846.89,3204.72 r59.06
  circle w0.5: c2846.89,3204.72 r59.06
  circle w0.5: c996.78,4985.49 r59.06
  circle w0.5: c996.78,4985.49 r59.06
  circle w0.5: c-27.13,3204.72 r59.06
  circle w0.5: c-27.13,3204.72 r59.06
  circle w0.5: c1208.09,420.18 r31.5
  circle w0.5: c1208.09,420.18 r31.5
  circle w0.5: c1813.46,769.68 r31.5
  circle w0.5: c1813.46,769.68 r31.5
  circle w0.5: c1208.09,1119.19 r31.5
  circle w0.5: c1208.09,1119.19 r31.5
  circle w0.5: c1822.99,4985.49 r59.06
  circle w0.5: c1822.99,4985.49 r59.06
  circle w0.5: c1813.46,769.68 r35.43
  circle w0.5: c1208.09,420.18 r35.43
  circle w0.5: c1208.09,1119.19 r35.43
  circle w0.5: c1409.88,769.68 r590.55
  circle w0.5: c1409.88,769.68 r590.55
  circle w0.5: c1409.88,769.68 r590.55
  circle w0.5: c1208.09,1119.19 r35.43
  circle w0.5: c1208.09,1119.19 r35.43
  circle w0.5: c1208.09,420.18 r35.43
  circle w0.5: c1208.09,420.18 r35.43
  circle w0.5: c1813.46,769.68 r35.43
  circle w0.5: c1813.46,769.68 r35.43
  circle w0.5: c1208.09,420.18 r35.43
  circle w0.5: c1813.46,769.68 r35.43
  circle w0.5: c1208.09,1119.19 r35.43
  circle w0.5: c1409.88,769.68 r590.55
  circle w0.5: c1814,769.23 r35.43
  circle w0.5: c1208.64,419.72 r35.43
  circle w0.5: c1208.64,1118.74 r35.43
  circle w0.5: c1410.43,769.23 r590.55
  circle w0.5: c1410.43,769.23 r590.55
  circle w0.5: c1410.43,769.23 r590.55
  circle w0.5: c1208.64,1118.74 r35.43
  circle w0.5: c1208.64,1118.74 r35.43
  circle w0.5: c1208.64,419.72 r35.43
  circle w0.5: c1208.64,419.72 r35.43
  circle w0.5: c1814,769.23 r35.43
  circle w0.5: c1814,769.23 r35.43
  circle w0.5: c1208.64,419.72 r35.43
  circle w0.5: c1814,769.23 r35.43
  circle w0.5: c1208.64,1118.74 r35.43
  circle w0.5: c1410.43,769.23 r590.55
Drill Drawing:
  circle w10: c880.62,5720.83 r33.33
  lines w10: 847.29,5604.17 913.96,5604.17 880.62,5537.5 847.29,5604.17 ; 847.29,5854.17 863.96,5854.17 880.62,5837.5 897.29,5854.17 913.96,5854.17 897.29,5870.83 913.96,5887.5 897.29,5887.5 880.62,5904.17 863.96,5887.5 847.29,5887.5 863.96,5870.83 847.29,5854.17 ; 847.29,5987.5 913.96,5987.5 913.96,6054.17 847.29,6054.17 847.29,5987.5
  lines w15: 787.5,5492.5 13681.89,5492.5 ; 787.5,6092.5 13681.89,6092.5 ; 1338.38,5342.5 1338.38,6242.5 ; 1928.22,5342.5 1928.22,6242.5 ; 3067.89,5342.5 3067.89,6242.5 ; 3573.76,5342.5 3573.76,6242.5 ; 4307.56,5342.5 4307.56,6242.5 ; 5807.12,5342.5 5807.12,6242.5 ; 6396.96,5342.5 6396.96,6242.5 ; 7142.76,5342.5 7142.76,6242.5 ; 7892.56,5342.5 7892.56,6242.5 ; 8746.32,5342.5 8746.32,6242.5 ; 10079.93,5342.5 10079.93,6242.5 ; 11413.53,5342.5 11413.53,6242.5 ; 12279.29,5342.5 12279.29,6242.5 ; 787.5,5342.5 13681.89,5342.5 13681.89,6242.5 787.5,6242.5 787.5,5342.5
  text "Symbol" at 877.5,6137.5 h72
  text "Count" at 1383.38,6137.5 h72
  text "Hole Size" at 1973.22,6137.5 h72
  text "Plated" at 3112.89,6137.5 h72
  text "Hole Type" at 3618.76,6137.5 h72
  text "Drill Layer Pair" at 4352.56,6137.5 h72
  text "Via/Pad" at 5852.12,6137.5 h72
  text "Pad Shape" at 6441.96,6137.5 h72
  text "Template" at 7187.76,6137.5 h72
  text "Description" at 7937.56,6137.5 h72
  text "Hole Tolerance (+)" at 8791.32,6137.5 h72
  text "Hole Tolerance (-)" at 10124.93,6137.5 h72
  text "Hole Length" at 11458.53,6137.5 h72
  text "Routed Path Length" at 12324.29,6137.5 h72
  text "3" at 1383.38,5987.5 h60
  text "39.37mil (1.000mm)" at 1973.22,5987.5 h60
  text "PTH" at 3112.89,5987.5 h60
  text "Round" at 3618.76,5987.5 h60
  text "Top Layer - Bottom Layer" at 4352.56,5987.5 h60
  text "Pad" at 5852.12,5987.5 h60
  text "(Mixed)" at 6441.96,5987.5 h60
  text "(Mixed)" at 7187.76,5987.5 h60
  text "-" at 11458.53,5987.5 h60
  text "-" at 12324.29,5987.5 h60
  text "8" at 1383.38,5837.5 h60
  text "122.05mil (3.100mm)" at 1973.22,5837.5 h60
  text "PTH" at 3112.89,5837.5 h60
  text "Round" at 3618.76,5837.5 h60
  text "Top Layer - Bottom Layer" at 4352.56,5837.5 h60
  text "Pad" at 5852.12,5837.5 h60
  text "Rounded" at 6441.96,5837.5 h60
  text "(Mixed)" at 7187.76,5837.5 h60
  text "-" at 11458.53,5837.5 h60
  text "-" at 12324.29,5837.5 h60
  text "12" at 1383.38,5687.5 h60
  text "9.84mil (0.250mm)" at 1973.22,5687.5 h60
  text "PTH" at 3112.89,5687.5 h60
  text "Round" at 3618.76,5687.5 h60
  text "Top Layer - Bottom Layer" at 4352.56,5687.5 h60
  text "Pad" at 5852.12,5687.5 h60
  text "Rounded" at 6441.96,5687.5 h60
  text "c35h25m0mx0" at 7187.76,5687.5 h60
  text "-" at 11458.53,5687.5 h60
  text "-" at 12324.29,5687.5 h60
  text "208" at 1383.38,5537.5 h60
  text "11.81mil (0.300mm)" at 1973.22,5537.5 h60
  text "PTH" at 3112.89,5537.5 h60
  text "Round" at 3618.76,5537.5 h60
  text "Top Layer - Bottom Layer" at 4352.56,5537.5 h60
  text "Via" at 5852.12,5537.5 h60
  text "Rounded" at 6441.96,5537.5 h60
  text "v60h30m0mx0" at 7187.76,5537.5 h60
  text "-" at 11458.53,5537.5 h60
  text "-" at 12324.29,5537.5 h60
  text "231 Total" at 1383.38,5387.5 h60

## Dimensions
3077.2,-57.09 to -269.25,-57.09 on Dimension
1857,5221.71 to 2880.35,-253.94 on Dimension